# Altium PCB iMX6 Rex Development Baseboard V1I1_PCB.PcbDoc (part 5 of 6)
Units mm, origin at the board's own origin, x right, y up, seen from the top; angles counter-clockwise.
Board outline 135 x 110 mm, 6 copper layers (L1, L2, L3, L4 (PWR), L5, L6), stack 1.542 mm thick; 580 components, 458 nets, 2100 pads, 1201 vias.
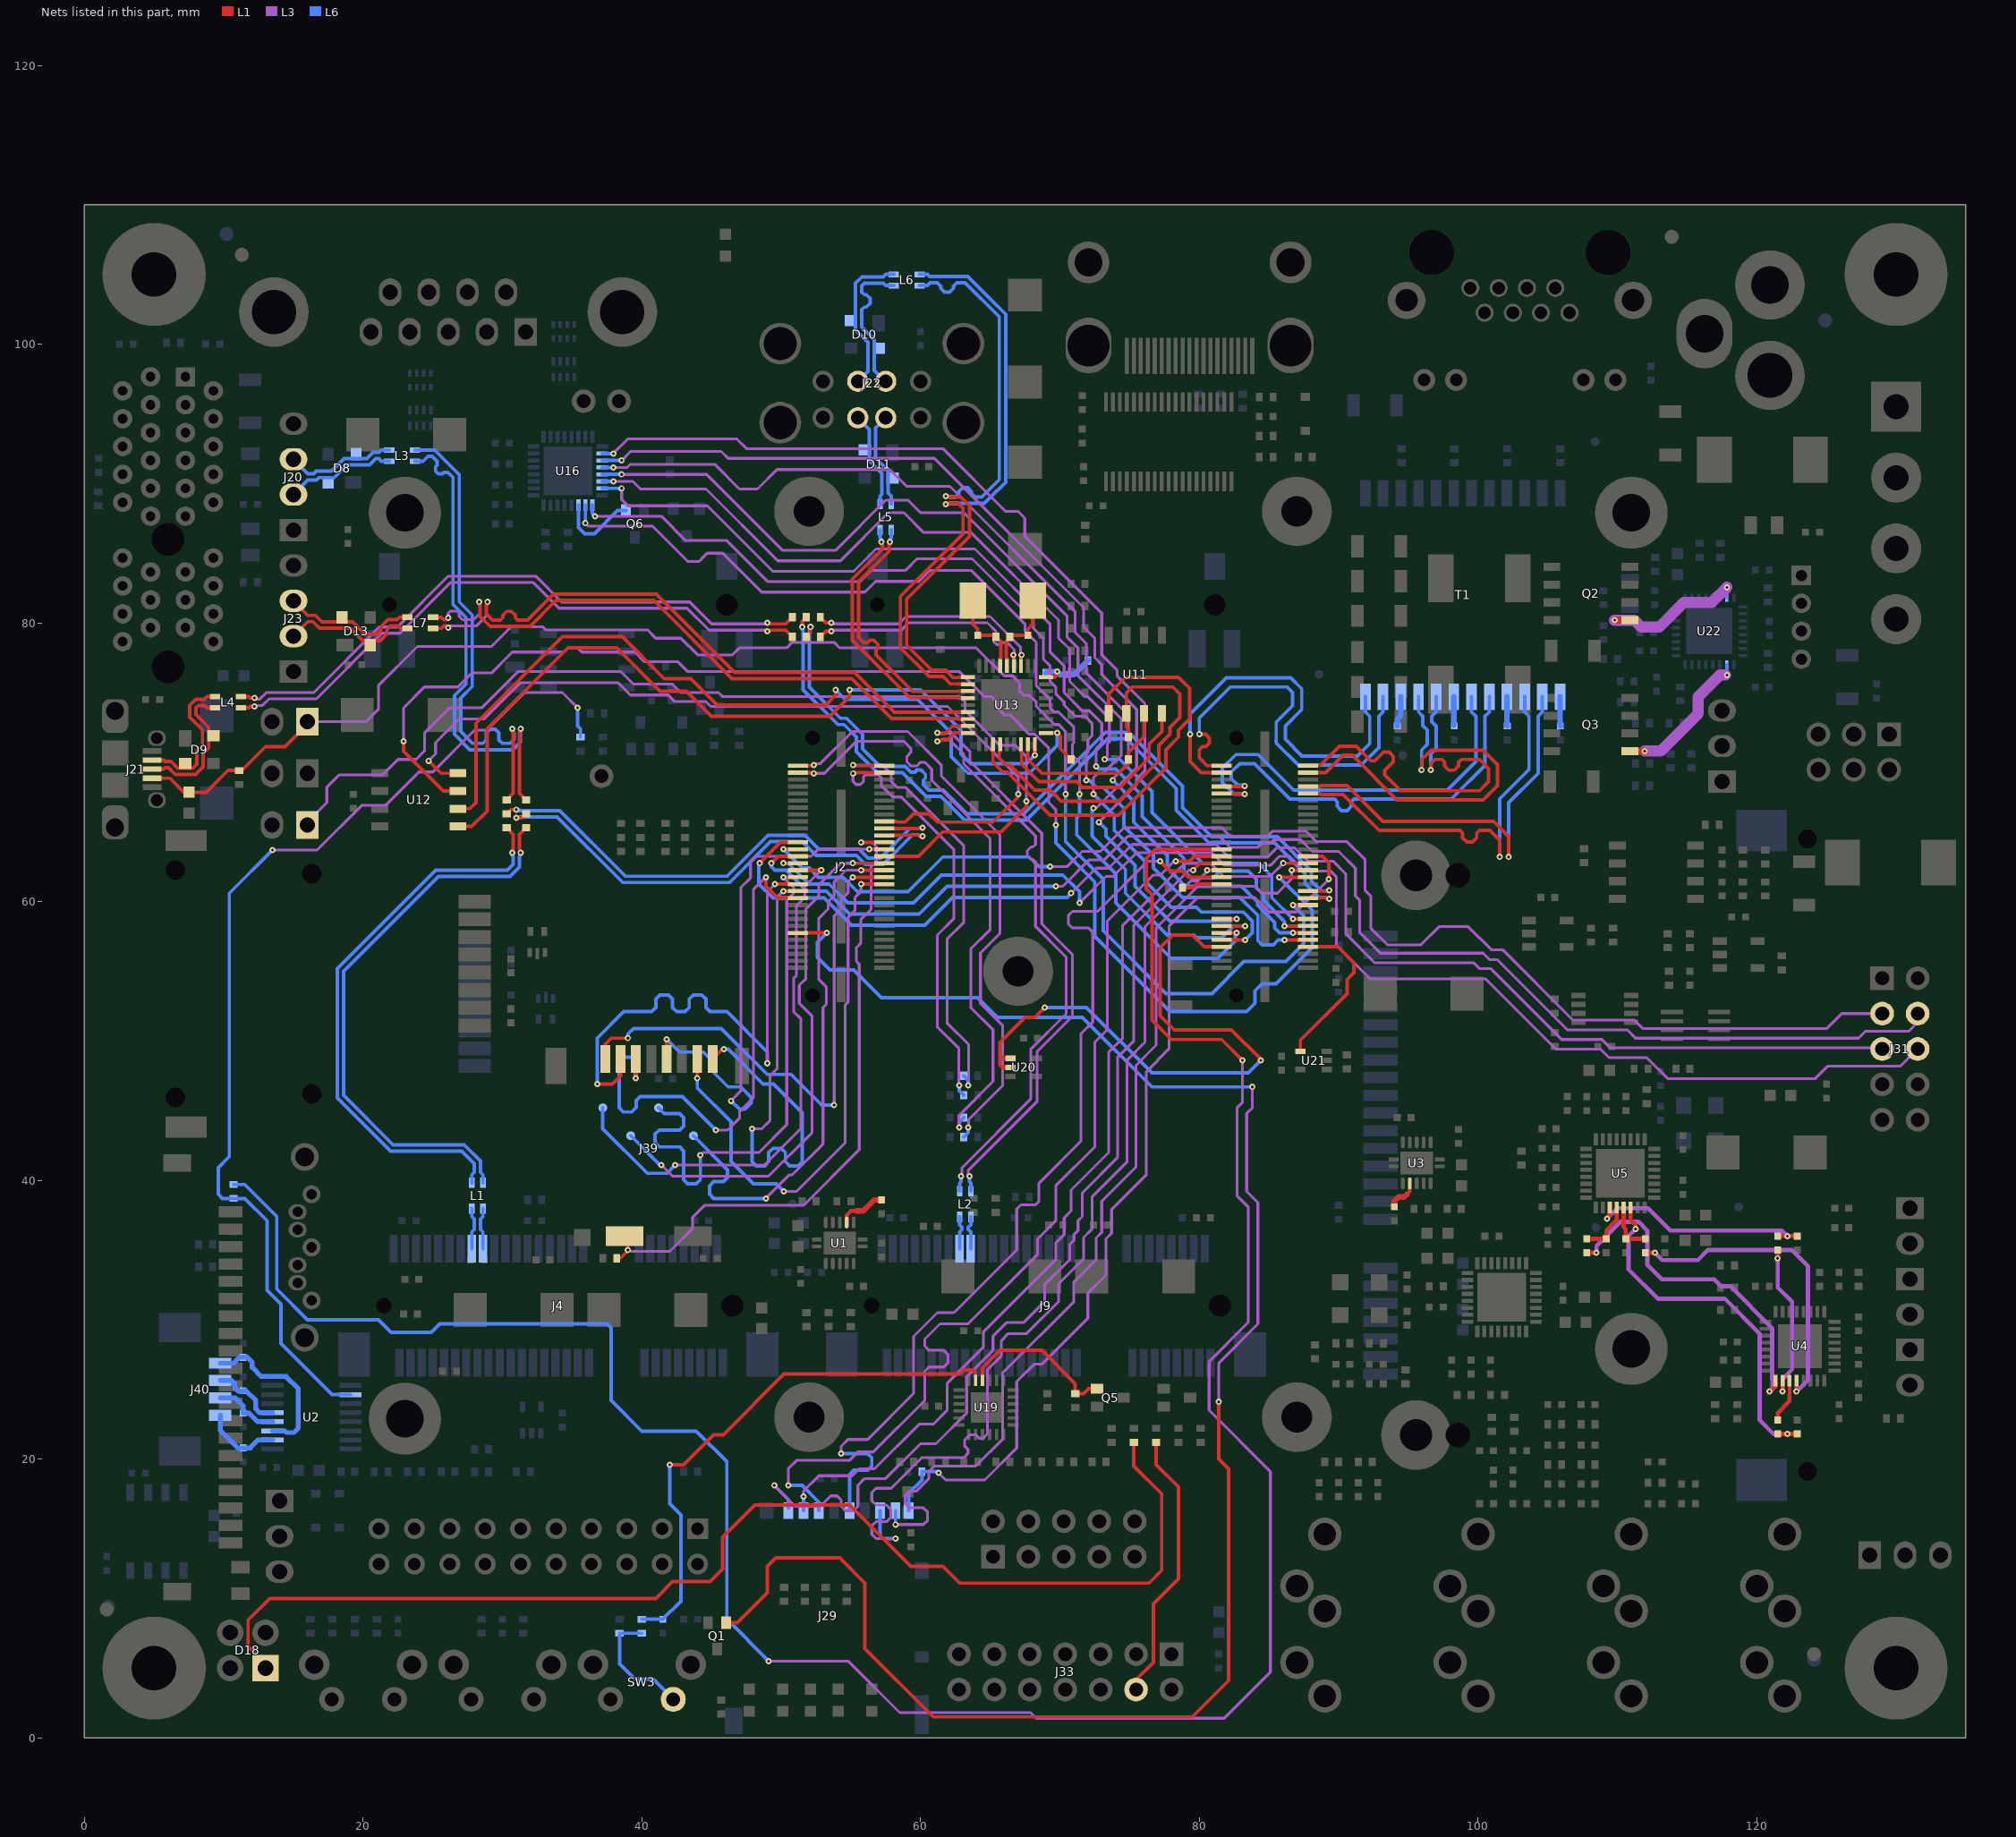
[diagram p9: the nets of this part, all layers, seen from the top]

## Via types
v1: diameter 0.45, hole 0.2, L1 to L6, tented both sides, 1092 vias
v2: diameter 1, hole 0.5, L1 to L6, tented both sides, 109 vias

## Nets (pads, with @x,y where several pads share a name; then routed paths per layer and width w, separated by ;. In a path a pad name is that pad's centre, name@x,y a point inside that pad or via, vN(x,y) a via of type N, cw(c..) or ccw(c..) an arc to the next point about the centre after c; other vN are vias at no path point) (continued)
SATA_RX_N: J2.58 R36.1 R37.1 | length 32.1
  L1 w0.25: v1(55.15,69.2) 55.2,69.25 J2.58@57.39,69.25
  L3 w0.2: v1(55.15,69.2) 55.15,68.625 55.375,68.4 55.678,68.4 55.9,68.622 55.9,68.95 56.05,69.1 56.95,69.1 57.2,68.85 57.2,68.31 58.01,67.5 58.61,67.5 62.4,63.71 62.4,58.8 61.2,57.6 61.2,51 62.75,49.45 62.75,46.825 v1(62.775,46.8)
  L6 w0.25: v1(62.775,46.8) 62.775,46.425 R36.1@63.1,46.1
SATA_RX_P: J2.60 R38.1 R39.1 | length 32.1
  L1 w0.25: v1(55.15,69.8) 55.2,69.75 J2.60@57.39,69.75
  L3 w0.2: v1(55.15,69.8) 57.24,69.8 57.9,69.14 57.9,68.6 58.3,68.2 58.9,68.2 63.1,64 63.1,58.51 61.9,57.31 61.9,51.29 63.45,49.74 63.45,46.825 v1(63.425,46.8)
  L6 w0.25: R38.1@63.1,47.5 63.425,47.175 v1(63.425,46.8)
SATA_TX_N: J2.57 R40.1 R41.1 | length 43.1
  L1 w0.25: J2.57@51.21,69.25 52.3,69.25 v1(52.35,69.2)
  L3 w0.2: v1(52.35,69.2) 53.1,69.2 55.403,71.503 58.797,71.503 59.3,71 59.3,70.7 59.025,70.425 59.025,70.025 59.325,69.725 59.725,69.725 60,70 60.3,70 60.8,69.5 60.8,68.7 65,64.5 65,58 63.6,56.6 63.6,52.4 65.2,50.8 65.2,47.1 62.75,44.65 62.75,43.825 v1(62.775,43.8)
  L6 w0.25: v1(62.775,43.8) 62.775,44.175 R40.1@63.1,44.5
SATA_TX_P: J2.59 R42.1 R43.1 | length 43.1
  L1 w0.25: J2.59@51.21,69.75 52.3,69.75 v1(52.35,69.8)
  L3 w0.2: v1(52.35,69.8) 52.45,69.9 52.81,69.9 55.113,72.203 59.087,72.203 61.5,69.79 61.5,68.99 65.7,64.79 65.7,57.71 64.3,56.31 64.3,52.69 65.9,51.09 65.9,46.81 63.45,44.36 63.45,43.825 v1(63.425,43.8)
  L6 w0.25: R42.1@63.1,43.1 63.425,43.425 v1(63.425,43.8)
SD2_ACT: J2.11 Q1.1 | length 131.3
  L1 w0.25: Q1.1@46.05,8.25 46.85,8.25 49,10.4 49,12.3 49.6,12.9 54.2,12.9 56,11.1 56,6.4 60.9,1.5 79.5,1.5 82.1,4.1 82.1,19.3 81.4,20 v1(81.4,24.1) ; J2.11@51.21,57.75 v1(53.27,57.75)
  L3 w0.2: v1(81.4,24.1) 81.4,26.9 84.2,29.7 84.2,38.4 83.4,39.2 83.4,44.8 83.8,45.2 v1(83.8,46.7)
  L6 w0.25: v1(53.27,57.75) 52.62,57.1 52.6,57.1 52.6,56 53.5,55.1 55.2,55.1 57.2,53.1 64.1,53.1 65.5,51.7 71.6,51.7 76.6,46.7 v1(83.8,46.7)
SD2_CD: J2.38 J39.9 R104.2 | length 47.3
  L1 w0.25: R104.2@38.2,34.4 38.458,34.4 38.94,34.882 v1@38.975,34.882 ; J39.9@38.775,36 38.975,35.8 39,35.775 v1(39,35) ; v1(55.73,64.25) J2.38@57.39,64.25
  L3 w0.2: v1@39.2,34.9 42,34.9 43.65,36.55 43.65,37.35 44.5,38.2 51.6,38.2 55.6,42.2 55.6,55.5 55.4,55.7 55.4,56.7 55.7,57 55.7,58.7 56.45,59.45 56.45,62.52 56.83,62.9 56.83,63.15 56.83,63.957 56.537,64.25 v1(55.73,64.25)
SD2_CLK: J2.36 J39.5 | length 39.6
  L1 w0.25: J39.5@41.775,48.7 v1(41.775,50.125) ; v1(56.33,63.75) J2.36@57.39,63.75
  L3 w0.2: v1(46.4,45.7) 47.1,46.4 47.1,61 47.8,61.7 47.8,62.807 48.243,63.25 52.15,63.25 52.65,63.75 v1(56.33,63.75)
  L6 w0.25: v1(41.775,50.125) 42.7,49.2 44.4,49.2 45.2,48.4 45.2,47.693 46.193,46.7 47.1,46.7 47.85,45.95 47.85,45.55 47.4,45.1 47,45.1 v1(46.4,45.7)
SD2_CMD: J2.21 J39.3 | length 39.6
  L1 w0.25: v1(39.575,47.325) J39.3@39.575,48.7 ; v1(48.9,61.75) 48.9,61.1 49.75,60.25 J2.21@51.21,60.25
  L3 w0.2: v1(45.3,43.6) 46.15,43.6 47,44.45 47,44.9 48,45.9 48,60.85 v1(48.9,61.75)
  L6 w0.25: v1(39.575,47.325) 39.575,48.525 39.275,48.825 38.675,48.825 38.375,48.525 38.375,45.2 38.675,44.9 39.275,44.9 39.6,45.225 39.6,45.725 39.875,46 42.9,46 v1(45.3,43.6)
SD2_DATA0: J2.26 J39.7 | length 39.6
  L1 w0.25: v1(43.975,47.325) J39.7@43.975,48.7 ; v1(55.73,61.25) J2.26@57.39,61.25
  L3 w0.2: v1(50.2,39.2) 51.1,39.2 54.6,42.7 54.6,52.6 54.8,52.8 54.8,58.87 55.3,59.37 55.3,60.3 55.73,60.73 v1(55.73,61.25)
  L6 w0.25: v1(43.975,47.325) 43.975,46.625 46.4,44.2 46.4,41.35 48,39.75 49.65,39.75 v1(50.2,39.2)
SD2_DATA1: J2.23 J39.8 | length 39.6
  L1 w0.25: J39.8@45.075,48.7 45.775,49.4 v1(45.9,49.4) ; v1(50.15,60.75) J2.23@51.21,60.75
  L3 w0.2: v1(47.9,43.7) 48.6,43.7 49.2,44.3 49.2,47.5 49.7,48 49.7,60.3 v1(50.15,60.75)
  L6 w0.25: v1(45.9,49.4) 46.2,49.4 48.7,46.9 49.45,46.9 51.5,44.85 51.5,41.334 51.2,41.034 50.6,41.034 50.3,41.334 50.3,41.984 50,42.284 49.4,42.284 49.1,41.984 49.1,41.334 48.8,41.034 48.2,41.034 47.9,41.334 v1(47.9,43.7)
SD2_DATA2: J2.28 J39.1 | length 39.6
  L1 w0.25: J39.1@37.375,48.7 37.375,49.775 37.8,50.2 v1(39,50.2) ; v1(55.13,61.75) J2.28@57.39,61.75
  L3 w0.2: v1(53.8,45.4) 53.8,58.97 54.3,59.47 54.3,60.131 54.8,60.631 54.8,61.42 v1(55.13,61.75)
  L6 w0.25: v1(39,50.2) 39,50.5 39.4,50.9 45.707,50.9 49.007,47.6 50.7,47.6 52.9,45.4 v1(53.8,45.4)
SD2_DATA3: J2.25 J39.2 | length 39.6
  L1 w0.25: v1(36.8,46.9) 37.9,46.9 38.475,47.475 J39.2@38.475,48.7 ; v1(49.55,61.25) J2.25@51.21,61.25
  L3 w0.2: v1(49,48.4) 49,60.7 v1(49.55,61.25)
  L6 w0.25: v1(36.8,46.9) 36.8,50.2 38.7,52.1 40.7,52.1 41,52.4 41,53 41.3,53.3 41.9,53.3 42.2,53 42.2,52.4 42.5,52.1 43.1,52.1 43.4,52.4 43.4,53 43.7,53.3 44.3,53.3 44.6,53 44.6,52.4 44.9,52.1 46.1,52.1 49,49.2 v1(49,48.4)
SD2_DATA4: J2.30 TP7.1 | length 39.6
  L1 w0.25: v1(55.73,62.25) J2.30@57.39,62.25
  L3 w0.2: v1(48.9,38.7) 50.6,40.4 50.8,40.4 53,42.6 53,52.4 53.25,52.65 53.25,53.85 52.7,54.4 52.7,58.8 53.37,59.47 53.37,60 53.8,60.43 53.8,61.4 54.65,62.25 v1(55.73,62.25)
  L6 w0.25: TP7.1@43.7,43.2 46.15,40.75 46.15,40.2 45.85,39.9 45.15,39.9 44.85,39.6 44.85,39 45.15,38.7 v1(48.9,38.7)
SD2_DATA5: J2.27 TP6.1 | length 39.6
  L1 w0.25: v1(50.15,61.75) J2.27@51.21,61.75
  L3 w0.2: v1(44.2,41.8) 44.4,42 48.4,42 50.4,44 50.4,60.1 50.9,60.6 50.9,61 v1(50.15,61.75)
  L6 w0.25: TP6.1@41.2,45.2 41.6,44.8 42.7,44.8 43,44.5 43,43.9 42.7,43.6 41.25,43.6 40.95,43.3 40.95,42.7 41.25,42.4 42.7,42.4 43,42.1 43,40.05 43.3,39.75 43.9,39.75 44.2,40.05 v1(44.2,41.8)
SD2_DATA6: J2.32 TP9.1 | length 39.6
  L1 w0.25: v1(55.13,62.75) J2.32@57.39,62.75
  L3 w0.2: v1(41.4,41.1) 42.2,40.3 49.1,40.3 52.2,43.4 52.2,51.8 51.3,52.7 51.3,54 51.77,54.47 51.77,59.47 52.7,60.4 52.7,61.2 54.25,62.75 v1(55.13,62.75)
  L6 w0.25: TP9.1@39.2,43.2 41.3,41.1 v1(41.4,41.1)
SD2_DATA7: J2.29 TP8.1 | length 39.6
  L1 w0.25: J2.29@51.21,62.25 v1(52.87,62.25)
  L3 w0.2: v1(42.4,41.1) 48.8,41.1 51.4,43.7 51.4,51.6 50.9,52.1 50.9,54.5 51.1,54.7 51.1,59.7 51.7,60.3 51.7,61.08 v1(52.87,62.25)
  L6 w0.25: TP8.1@37.2,45.2 37.2,43.7 40.4,40.5 41.8,40.5 v1(42.4,41.1)
SD2_WP: J2.34 JP3.1 | length 75.8
  L1 w0.25: J2.34@57.39,63.25 59.85,63.25 61.6,65 65.8,65 67.6,66.8 v1(67.6,67.2)
  L3 w0.2: JP3.1@16,65.5 16,65.7 17.4,67.1 17.4,68.2 18.3,69.1 21.399,69.1 22.499,70.2 23.8,70.2 24.4,70.8 24.4,72.1 26.2,73.9 28.5,73.9 31.1,76.5 38.5,76.5 39.4,75.6 42.2,75.6 42.8,75 45.5,75 45.8,74.7 62.8,74.7 63.2,74.3 63.2,73.693 65.693,71.2 66.8,71.2 67.6,70.4 v1(67.6,67.2)
SD3_CD: J1.34 J29.9 R106.2 | length 70.1
  L1 w0.25: J1.34@87.79,63.25 88.85,63.25 89.3,62.8 v1(89.3,61.6)
  L3 w0.2: v1(61.3,19) 61.8,18.5 64.6,18.5 66.9,20.8 66.9,25.557 68.143,26.8 68.707,26.8 72,30.093 72,31.9 73.3,33.2 73.3,35.8 73.704,36.204 73.704,37.904 76.2,40.4 76.2,47.8 77.825,49.425 77.825,58.232 79.893,60.3 83.95,60.3 85,59.25 86.937,59.25 v1@89.3,61.613
  L6 w0.25: J29.9@59.15,16.3 59.15,17.55 60.1,18.5 R106.2@60.1,19.1 61.2,19.1 v1(61.3,19)
SD3_CLK: J1.27 J29.5 | length 70.1
  L1 w0.25: v1(77.2,62.9) 77.9,62.2 78.8,62.2 79.25,61.75 J1.27@81.61,61.75
  L3 w0.2: v1(54.3,20.4) 54.3,20.9 54.8,21.4 56.2,21.4 59.5,24.7 59.5,28.8 61.2,30.5 62.4,30.5 66.9,35 66.9,37.94 67.2,38.24 68.24,38.24 68.5,38.5 68.5,39.8 71.5,42.8 71.5,50.5 72.36,51.36 72.36,57.8 72.06,58.1 70.9,58.1 70.6,58.4 70.6,59 70.9,59.3 72.7,59.3 76.3,62.9 v1(77.2,62.9)
  L6 w0.25: v1(54.3,20.4) 56.2,20.4 56.5,20.1 56.5,19.5 56.2,19.2 55.2,19.2 54.9,18.9 J29.5@54.9,16.3
SD3_CMD: J1.33 J29.3 | length 70.1
  L1 w0.25: v1(78.3,62.9) 79.3,62.9 79.65,63.25 J1.33@81.61,63.25
  L3 w0.2: v1(50.5,18.1) 50.5,19.3 51.1,19.9 54.9,19.9 55.5,20.5 56.6,20.5 60.3,24.2 60.3,26.3 60.6,26.6 61.66,26.6 61.96,26.9 61.96,27.5 61.66,27.8 60.6,27.8 60.3,28.1 60.3,28.607 61.393,29.7 63.4,29.7 68.4,34.7 68.4,35.8 69.7,37.1 69.7,39.6 72.5,42.4 72.5,49.9 73.4,50.8 73.4,58.607 76.693,61.9 77.2,61.9 78.2,62.9 v1(78.3,62.9)
  L6 w0.25: v1(50.5,18.1) 51.507,18.1 52.7,16.907 J29.3@52.7,16.3
SD3_DATA0: J1.29 J29.7 | length 70.1
  L1 w0.25: v1(80.55,62.25) J1.29@81.61,62.25
  L3 w0.2: v1(58.2,14.3) 56.8,14.3 56.5,14.6 56.5,15.2 56.8,15.5 57.55,15.5 57.85,15.8 57.85,16.4 57.55,16.7 56.8,16.7 56.5,17 56.5,17.6 56.8,17.9 57.893,17.9 60.093,20.1 63.1,20.1 63.4,20.4 63.4,20.7 63.15,20.95 63.15,21.35 63.55,21.75 63.95,21.75 64.2,21.5 64.5,21.5 64.8,21.8 64.8,26.4 65.8,27.4 65.8,28.507 66.293,29 67.607,29 69.9,31.293 69.9,32.569 71.7,34.369 71.7,35.9 72.3,36.5 72.3,38.8 74.8,41.3 74.8,48.6 76.1,49.9 76.1,58.2 79.4,61.5 79.9,61.5 80.55,62.15 v1(80.55,62.25)
  L6 w0.25: J29.7@57.1,16.3 57.1,15 57.1,14.5 57.3,14.3 v1(58.2,14.3)
SD3_DATA1: J1.30 J29.8 | length 70.1
  L1 w0.25: v1(86.62,62.25) J1.30@87.79,62.25
  L3 w0.2: v1(58.2,15.3) 60.2,15.3 60.5,15.6 60.5,16.2 60.2,16.5 59.2,16.5 58.9,16.8 58.9,17.4 59.2,17.7 59.7,17.7 60.6,18.6 60.6,19.1 61,19.5 63.966,19.5 65.9,21.434 65.9,26.2 71,31.3 71,32.7 72.6,34.3 72.6,35.862 73,36.262 73,38.5 75.45,40.95 75.45,48.25 76.9,49.7 76.9,58.1 79.9,61.1 83.975,61.1 84.475,60.6 85.6,60.6 86.62,61.62 v1(86.62,62.25)
  L6 w0.25: v1(58.2,15.3) J29.8@58.2,16.3
SD3_DATA2: J1.31 J29.1 | length 70.1
  L1 w0.25: v1(79.55,62.25) 80.05,62.75 J1.31@81.61,62.75
  L3 w0.2: v1(49.5,18.1) 51,16.6 52.8,16.6 53.56,17.36 54,17.36 54.3,17.06 54.3,16.6 54.6,16.3 55.2,16.3 55.5,16.6 55.5,18.107 55.993,18.6 57.5,18.6 60,21.1 61.1,21.1 63.3,23.3 63.3,25.9 65.2,27.8 65.2,28.807 66.2,29.807 67.407,29.807 68.9,31.3 68.9,32.507 70.7,34.307 70.7,35.393 71.007,35.7 71.007,36.1 71.3,36.393 71.3,37.1 71.6,37.4 71.6,39.1 74.15,41.65 74.15,48.85 75.3,50 75.3,58.3 79.25,62.25 v1(79.55,62.25)
  L6 w0.25: v1(49.5,18.1) 50.5,17.1 J29.1@50.5,16.5
SD3_DATA3: J1.32 J29.2 | length 70
  L1 w0.25: v1(86.03,62.75) J1.32@87.79,62.75
  L3 w0.2: v1(51.6,17.3) 51.6,17.7 52.7,18.8 55.1,18.8 55.6,19.3 56.693,19.3 59.893,22.5 60.907,22.5 61.9,23.493 61.9,25.407 64.5,28.007 64.5,29.1 69.7,34.3 69.7,35.5 70.3,36.1 70.3,37.3 70.8,37.8 70.8,39.3 73.5,42 73.5,49.2 74.5,50.2 74.5,58.293 78.957,62.75 80.8,62.75 81.75,61.8 85.073,61.8 86.023,62.75 v1(86.03,62.75)
  L6 w0.25: J29.2@51.6,16.3 v1(51.6,17.3)
SD3_WP: J1.25 R105.2 | length 2.9
  L1 w0.25: R105.2@78.8,61 79.55,61 79.8,61.25 J1.25@81.61,61.25
SPKR_C_LOUT+: C52.2 U4.3 | length 3.2
  L1 w0.25: 122.35,24.608 U4.3@122.35,25.625
  L1 w0.3: C52.2@121.5,22.8 121.5,23.3 122.35,24.15 122.35,24.608
SPKR_C_LOUT-: C47.2 U4.4 | length 22.8
  L1 w0.28: v1(122.85,24.85) U4.4@122.85,25.625
  L1 w0.3: C47.2@112,34.8 v1(112.7,34.8)
  L3 w0.3: v1(112.7,34.8) 113.225,34.275 115.775,34.275 116.5,35 122.5,35 123.675,33.825 123.675,25.675 v1(122.85,24.85)
SPKR_C_ROUT+: C56.2 U4.2 | length 11.6
  L1 w0.28: v1(121.85,24.85) U4.2@121.85,25.625
  L1 w0.3: v1(121.5,34.4) C56.2@121.5,35
  L3 w0.3: v1(121.5,34.4) 121.5,32.3 122.525,31.275 122.525,26.425 121.85,25.75 v1(121.85,24.85)
SPKR_C_ROUT-: C55.2 U4.1 | length 24.8
  L1 w0.28: v1(120.9,24.85) 121,24.85 121.35,25.2 U4.1@121.35,25.625
  L1 w0.3: C55.2@107.8,34.8 v1(108.5,34.8)
  L3 w0.28: v1(120.9,24.85) 121.1,25.05 121.1,25.7
  L3 w0.3: v1(108.5,34.8) 108.5,35.3 110.225,37.025 111.517,37.025 112.142,36.4 112.142,33.958 113.2,32.9 116.942,32.9 117.442,32.4 118.1,32.4 121.1,29.4 121.1,25.7
SPKR_LOUT+: C52.1 C210.1 U5.22 | length 26.1
  L1 w0.3: U5.22@110.95,38.05 110.95,37.15 111.3,36.8 v1(111.3,36.5) ; C52.1@121.5,21.8 v1(122.2,21.8) C210.1@122.9,21.8
  L3 w0.3: v1(111.3,36.5) 110.8,36 110.8,33.6 112.9,31.5 117.7,31.5 120.2,29 120.2,22.8 121.2,21.8 v1(122.2,21.8)
SPKR_LOUT-: C47.1 C209.2 U5.21 | length 3.7
  L1 w0.3: U5.21@110.45,38.05 110.45,36.65 110.6,36.5 C209.2@110.6,35.8 C47.1@112,35.8
SPKR_ROUT+: C56.1 C212.1 U5.19 | length 16.4
  L1 w0.3: v1(109.25,37.25) 109.45,37.45 U5.19@109.45,38.05 ; C56.1@121.5,36 v1(122.2,36) C212.1@122.9,36
  L3 w0.3: v1(109.25,37.25) 110,38 112.2,38 113.8,36.4 121.8,36.4 v1(122.2,36)
SPKR_ROUT-: C55.1 C211.2 U5.20 | length 4
  L1 w0.3: C55.1@107.8,35.8 C211.2@109.2,35.8 109.2,36.4 109.95,37.15 U5.20@109.95,38.05
SS_+1V5: C21.1 U1.7 | length 3.5
  L1 w0.28: U1.7@54.7,36.975 54.7,37.5 55,37.8 55.4,37.8
  L1 w0.4: 55.4,37.8 55.9,37.8 56.7,38.6 C21.1@57.2,38.6
SS_+1V8_AUDIO2: C36.1 U3.7 | length 2.2
  L1 w0.283: 95,39.1 95.1,39.2 U3.7@95.1,39.775
  L1 w0.4: C36.1@94,38.1 94,38.5 94.3,38.8 94.7,38.8 94.9,39
SYS_POKN: J1.8 U21.4 | length 11.7
  L1 w0.25: U21.4@87.25,49.25 87.25,50.05 90.6,53.4 90.6,54.4 91.1,54.9 91.1,55.6 89.95,56.75 89.1,56.75 J1.8@87.79,56.75
SYS_RSTN: J1.7 U20.1 U20.2 | length 43.9
  L1 w0.25: U20.2@66.45,48.1 65.9,48.1 65.7,48.3 65.7,49 ; U20.1@66.45,48.75 65.95,48.75 65.7,49 ; v1(68.9,52.4) 68.2,51.7 67.5,51.7 65.7,49.9 65.7,49 ; J1.7@81.61,56.75 80.35,56.75 79.5,57.6 78.1,57.6 77.2,56.7 77.2,51.8 78.2,50.8 82.3,50.8 v1@84.4,48.7
  L6 w0.25: v1(68.9,52.4) 71.9,52.4 76.6,47.7 83.5,47.7 v1(84.4,48.6)
TCT0: C118.2 T1.10 | length 2.2
  L6 w0.4: C118.2@94.2,72.6 94.2,73.073 94.455,73.328 T1.10@94.455,74.697
TCT1: C116.2 T1.4 | length 2.1
  L6 w0.4: T1.4@102.075,74.697 102.075,72.625 C116.2@102.1,72.6
TCT2: C117.2 T1.7 | length 2
  L6 w0.4: C117.2@98.265,72.665 T1.7@98.265,74.697
TCT3: C114.2 T1.1 | length 2.1
  L6 w0.4: T1.1@105.885,74.697 105.885,72.615 C114.2@105.9,72.6
TRD0_N: J1.57 T1.12 | length 29.9
  L1 w0.25: v1(79.35,72) 79.35,70.05 80.15,69.25 J1.57@81.61,69.25
  L6 w0.25: v1(79.35,72) 79.35,73.45 81.95,76.05 86.569,76.05 87.35,75.269 87.35,73.781 86.169,72.6 86.169,71.65 87.369,70.45 91.35,70.45 92.225,71.325 92.225,73.29 91.915,73.6 T1.12@91.915,74.697
TRD0_P: J1.59 T1.11 | length 29.9
  L1 w0.25: v1(80,72) 80.45,72 80.725,71.725 80.725,71.375 80.45,71.1 80.2,71.1 80,70.9 80,70.319 80.569,69.75 J1.59@81.61,69.75
  L6 w0.25: v1(80,72) 80,73.181 82.219,75.4 86.3,75.4 86.7,75 86.7,74.05 85.519,72.869 85.519,71.512 ; 85.5,71.531 85.519,71.512 ; T1.11@93.185,74.697 93.185,73.6 92.875,73.29 92.875,71.056 91.619,69.8 87.1,69.8 85.519,71.381 85.519,71.512
TRD1_N: J1.51 T1.6 | length 29.9
  L1 w0.25: J1.51@81.61,67.75 83.2,67.75 v1(83.25,67.7)
  L6 w0.25: v1(83.25,67.7) 82.5,67.7 81.65,68.55 81.65,69.569 82.631,70.55 84.223,70.55 86.773,68 97.8,68 99.845,70.045 99.845,73.29 99.535,73.6 T1.6@99.535,74.697
TRD1_P: J1.53 T1.5 | length 29.9
  L1 w0.25: J1.53@81.61,68.25 83.2,68.25 v1(83.25,68.3)
  L6 w0.25: v1(83.25,68.3) 83.2,68.35 82.769,68.35 82.3,68.819 82.3,69.3 82.9,69.9 83.954,69.9 86.504,67.35 89.7,67.35 89.9,67.15 89.9,66.825 90.2,66.525 90.6,66.525 90.9,66.825 90.9,67.15 91.1,67.35 98.069,67.35 100.495,69.776 100.495,73.29 100.805,73.6 T1.5@100.805,74.697
TRD2_N: J1.58 T1.9 | length 29.9
  L1 w0.25: J1.58@87.79,69.25 89.069,69.25 90.319,70.5 90.981,70.5 94.181,67.3 100.369,67.3 101.4,68.331 101.4,69.819 100.37,70.85 96.631,70.85 95.95,70.169 v1(95.95,69.45)
  L6 w0.25: T1.9@95.725,74.697 95.725,73.6 96.035,73.29 96.035,72.631 96.35,72.316 96.35,71.269 95.95,70.869 v1(95.95,69.45)
TRD2_P: J1.60 T1.8 | length 29.9
  L1 w0.25: J1.60@87.79,69.75 88.65,69.75 90.05,71.15 91.25,71.15 92.3,70.1 92.6,70.1 93.225,70.725 93.625,70.725 93.925,70.425 93.925,70.025 93.3,69.4 93.3,69.1 94.45,67.95 100.1,67.95 100.75,68.6 100.75,69.55 100.1,70.2 98.8,70.2 98.6,70 98.6,69.725 98.3,69.425 97.9,69.425 97.6,69.725 97.6,70 97.4,70.2 96.9,70.2 96.6,69.9 v1(96.6,69.45)
  L6 w0.25: v1(96.6,69.45) 96.6,70.6 97,71 97,72.585 96.685,72.9 96.685,73.29 96.995,73.6 T1.8@96.995,74.697
TRD3_N: J1.52 T1.3 | length 29.9
  L1 w0.25: J1.52@87.79,67.75 88.65,67.75 88.725,67.675 90.325,67.675 92.9,65.1 98.7,65.1 98.9,64.9 98.9,64.575 99.2,64.275 99.6,64.275 99.9,64.575 99.9,64.9 100.1,65.1 100.85,65.1 101.55,64.4 v1(101.55,63.2)
  L6 w0.25: v1(101.55,63.2) 101.55,67.369 103.655,69.474 103.655,73.29 103.345,73.6 T1.3@103.345,74.697
TRD3_P: J1.54 T1.2 | length 29.9
  L1 w0.25: J1.54@87.79,68.25 88.65,68.25 88.725,68.325 90.594,68.325 93.169,65.75 101.119,65.75 102.2,64.669 v1(102.2,63.2)
  L6 w0.25: v1(102.2,63.2) 102.2,67.1 104.305,69.205 104.305,73.29 104.615,73.6 T1.2@104.615,74.697
TS_X+: C153.1 J40.4 U2.3 | length 11.8
  L6 w0.35: J40.4@9.75,26.875 10.7,26.875 11.125,27.3 C153.1@11.4,27.3 11.7,27.3 12.049,26.951 12.049,26.574 12.697,25.925 14.475,25.925 15.35,25.05 15.35,22.222 15.028,21.9 14.5,21.9 14.375,22.025 U2.3@13.5,22.025
TS_X-: C155.1 J40.3 U2.5 | length 5.2
  L6 w0.35: J40.3@9.75,25.625 10.575,25.625 10.8,25.4 10.8,25.1 11.025,24.875 11.325,24.875 C155.1@11.35,24.85 ; C155.1@11.4,24.9 11.6,24.9 12.3,24.2 12.3,23.6 12.575,23.325 U2.5@13.5,23.325
TS_Y+: C152.1 J40.1 U2.2 | length 5.6
  L6 w0.35: J40.1@9.75,23.125 9.75,22.05 11,20.8 C152.1@11.4,20.8 11.9,20.8 12.475,21.375 U2.2@13.5,21.375
TS_Y-: C154.1 J40.2 U2.4 | length 4.7
  L6 w0.35: J40.2@9.75,24.375 10.825,24.375 11.4,23.8 C154.1@11.4,23.3 11.8,23.3 12.425,22.675 U2.4@13.5,22.675
TSC_INT: J1.35 R174.1 | length 177.4
  L1 w0.25: J1.35@81.61,63.75 76.85,63.75 76.2,63.1 76.2,60.9 76.6,60.5 76.6,51.5 78,50.1 81.6,50.1 v1(83.1,48.6)
  L3 w0.2: v1(49.1,5.5) 54.8,5.5 58.5,1.8 67.9,1.8 68.3,1.4 81.8,1.4 85.1,4.7 85.1,19.1 80.7,23.5 80.7,26.993 83.5,29.793 83.5,38.1 82.7,38.9 82.7,45.2 83.1,45.6 v1(83.1,48.6)
  L6 w0.25: R174.1@10.7,39.7 11.5,39.7 13.8,37.4 13.8,32.2 16,30 21.1,30 22,29.1 24.9,29.1 25.5,29.7 37.5,29.7 37.8,29.4 37.8,24.2 40,22 43.9,22 46.1,19.8 46.1,8.5 v1(49.1,5.5)
TSC_PENIRQ: R173.1 R174.2 U2.10 | length 75.6
  L3 w0.2: v1(13.5,63.7) 16.7,63.7 19.9,66.9 21.6,66.9 24,69.3 25,69.3 28,72.3 28.9,72.3 31.6,75 34.3,75 v1(35.4,73.9)
  L6 w0.25: v1(13.5,63.7) 10.4,60.6 10.4,41.7 9.6,40.9 9.6,39 9.9,38.7 R174.2@10.7,38.7 11.5,38.7 13.1,37.1 13.1,32.1 14.1,31.1 14.1,28.3 17.775,24.625 U2.10@19.1,24.625 ; v1(35.4,73.9) 35.4,72.6 35.6,72.4 R173.1@35.6,71.8
UART1_CTS: J1.11 U16.18 | length 73
  L1 w0.25: J1.11@81.61,57.75 v1(82.67,57.75)
  L3 w0.2: v1(35.95,87.15) 36.15,86.95 40.75,86.95 43.3,84.4 44.1,84.4 44.4,84.7 44.4,84.707 44.693,85 45.8,85 48.6,82.2 56,82.2 56.775,82.975 59.875,82.975 60.65,83.75 63.65,83.75 67.5,79.9 67.5,79.4 68.3,78.6 68.3,75.5 69.3,74.5 69.3,73.893 69.593,73.6 69.9,73.6 71,72.5 71,71.407 70.9,71.307 70.9,70.5 71.4,70 v1(71.4,67.7)
  L6 w0.25: v1(35.95,87.15) U16.18@35.95,88.45 ; v1@71.4,67.5 71.4,66.2 71.2,66 71.2,64.8 74,62 74,59.9 77.975,55.925 81.325,55.925 82.58,57.18 82.58,57.66 v1(82.67,57.75)
UART1_DCD: J1.16 U16.14 | length 72.6
  L1 w0.25: v1(86.73,58.75) J1.16@87.79,58.75
  L3 w0.2: v1(37.95,90.15) 39.35,90.15 39.9,89.6 44.6,89.6 49.75,84.45 54.243,84.45 57.693,87.9 58.8,87.9 60.2,86.5 63.6,86.5 69.9,80.2 69.9,78.907 70.7,78.107 70.7,75.804 71.804,74.7 72.007,74.7 73.546,73.161 73.546,71.454 73.4,71.307 73.4,70.4 v1(73.2,70.2)
  L6 w0.25: U16.14@37.15,90.15 v1(37.95,90.15) ; v1(73.2,70.2) 74.3,70.2 76.6,67.9 76.6,66.4 80.25,62.75 84.25,62.75 85.2,61.8 85.2,60.28 v1(86.73,58.75)
UART1_DSR: J1.9 U16.13 | length 75.9
  L1 w0.25: J1.9@81.61,57.25 v1(83.28,57.25)
  L3 w0.2: v1(38.55,90.65) 44.66,90.65 50.11,85.2 53.9,85.2 57.5,88.8 59.1,88.8 60,87.9 63.1,87.9 70.5,80.5 70.5,79 71.3,78.2 71.3,76.2 74.4,73.1 74.4,70.5 73.1,69.2 72.7,69.2 72.4,68.9 v1(72.4,67.7)
  L6 w0.25: U16.13@37.15,90.65 v1(38.55,90.65) ; v1(72.4,67.7) 73.9,66.2 73.9,65.1 76.1,62.9 76.1,61.493 77.996,59.596 79.289,59.596 79.293,59.6 79.793,59.6 80.143,59.25 83.15,59.25 83.8,58.6 83.8,57.77 v1(83.28,57.25)
UART1_DTR: J1.15 U16.10 | length 75
  L1 w0.25: J1.15@81.61,58.75 v1(82.67,58.75)
  L3 w0.2: v1(37.95,92.15) 39,93.2 46.807,93.2 47.507,92.5 61.6,92.5 66.1,88 67,88 67,87.996 67.475,87.521 67.475,86.225 73,80.7 73,77.707 74.1,76.607 74.1,76.2 76.1,74.2 76.1,69.4 75.5,68.8 75.5,68.4 v1(72.8,65.7)
  L6 w0.25: U16.10@37.15,92.15 v1(37.95,92.15) ; v1(72.8,65.7) 73.3,65.2 73.3,64.7 75.4,62.6 75.4,61.1 77.9,58.6 82.241,58.6 82.391,58.75 v1(82.67,58.75)
UART1_RI: J1.10 U16.17 | length 73.9
  L1 w0.25: v1(86.12,57.25) J1.10@87.79,57.25
  L3 w0.2: v1(36.65,87.65) 41.4,87.65 43.15,85.9 46.1,85.9 49.05,82.95 55.65,82.95 56.45,83.75 58.9,83.75 59.75,84.6 63.7,84.6 68.1,80.2 68.1,79.593 68.8,78.893 68.8,77.4 69.3,76.9 69.3,75.8 69.7,75.4 69.7,74.907 70.3,74.307 70.3,74.1 71.1,73.3 71.807,73.3 72.3,72.807 72.3,71.893 72,71.593 72,70.7 71.9,70.6 v1(71.9,68.7)
  L6 w0.25: U16.17@36.45,88.45 36.45,87.85 v1(36.65,87.65) ; v1(71.9,68.7) 72.107,68.7 72.607,68.2 73.1,68.2 74.6,66.7 74.6,65.4 76.7,63.3 76.7,62.4 78.8,60.3 82.9,60.3 84.2,59 84.2,57.193 84.493,56.9 85.3,56.9 85.65,57.25 v1(86.12,57.25)
UART1_RTS: J1.13 U16.11 | length 76
  L1 w0.25: J1.13@81.61,58.25 v1(83.28,58.25)
  L3 w0.2: v1@38.45,91.65 v1@38.5,91.7 ; v1(38.55,91.65) 39.2,92.3 45.7,92.3 46.2,91.8 61,91.8 71.7,81.1 71.7,79.693 72.5,78.893 72.5,77.5 73,77 73,76.707 73,76.293 75.5,73.793 75.5,69.6 72.6,66.7 v1(72.4,66.7)
  L6 w0.25: U16.11@37.15,91.65 v1(38.55,91.65) ; v1(72.4,66.7) 72.3,66.6 72.3,64.7 74.7,62.3 74.7,60.6 77.7,57.6 79.593,57.6 79.793,57.4 81.613,57.4 82.456,58.244 ; 82.456,58.25 v1(83.28,58.25)
UART1_RXD: J1.14 U16.15 | length 72.7
  L1 w0.25: v1(86.12,58.25) J1.14@87.79,58.25
  L3 w0.2: v1(38.55,89.65) 38.55,88.85 39,88.4 44.7,88.4 49.4,83.7 55.2,83.7 56.8,85.3 63.9,85.3 69.3,79.9 69.3,77.9 70.3,76.9 70.3,76.293 70.3,74.993 71.593,73.7 72.1,73.7 73,72.8 73,71.393 72.6,70.993 v1(72.6,69.7)
  L6 w0.25: U16.15@37.15,89.65 v1(38.55,89.65) ; v1(72.6,69.7) 72.8,69.5 74,69.5 75.9,67.6 75.9,66.1 78.9,63.1 78.9,62.193 79.393,61.7 81,61.7 81.5,62.2 83.5,62.2 84.1,61.6 84.1,60.993 84.493,60.6 84.5,60.6 84.6,60.5 84.6,60.093 86.12,58.573 v1(86.12,58.25)
UART1_TXD: J1.12 U16.12 | length 74
  L1 w0.25: v1(86.73,57.75) J1.12@87.79,57.75
  L3 w0.2: v1(37.95,91.15) 38.95,91.15 39.175,91.375 45.225,91.375 47,89.6 48.3,89.6 49.7,91 57.8,91 59,89.8 62.1,89.8 71.1,80.8 71.1,79.3 71.9,78.5 71.9,76.393 74.9,73.393 74.9,69.9 73.8,68.8 v1(73.8,68.7)
  L6 w0.25: U16.12@37.15,91.15 v1(37.95,91.15) ; v1(73.8,68.7) 75.3,67.2 75.3,65.7 77.7,63.3 77.7,62.4 79,61.1 83.027,61.1 84.17,59.957 84.17,59.737 85.4,58.507 85.4,58.1 85.75,57.75 v1(86.73,57.75)
UART2_CTS: J2.31 J31.6 | length 98.3
  L1 w0.25: v1(50.15,62.75) J2.31@51.21,62.75
  L3 w0.2: v1(71.4,59.9) 73.3,61.8 73.8,61.8 75.5,63.5 80.899,63.5 81.799,62.6 85.1,62.6 85.75,63.25 86.5,63.25 87.55,62.2 89.407,62.2 89.83,61.777 89.83,56.87 92.252,54.448 100.552,54.448 105.6,49.4 108.807,49.4 109.407,48.8 112.1,48.8 113.6,47.3 124.2,47.3 125.1,48.2 130.32,48.2 J31.6@131.54,49.42
  L6 w0.25: v1(50.15,62.75) 50.497,62.75 51.997,61.25 53.45,61.25 53.45,61.243 54.793,59.9 59.5,59.9 61.5,61.9 70.207,61.9 71.4,60.707 v1(71.4,59.9)
UART2_RTS: J2.33 J31.4 | length 98.4
  L1 w0.25: v1(49.3,62.75) 49.8,63.25 J2.33@51.21,63.25
  L3 w0.2: v1(69.7,61.1) 70.2,61.1 72.1,63 73.2,63 74.9,64.7 81.4,64.7 82.2,63.9 84.2,63.9 84.2,63.907 84.493,64.2 85.1,64.2 85.35,64.45 87.25,64.45 88.1,63.6 90,63.6 91.2,62.4 91.2,60.407 91.5,60.107 91.5,57.8 93,56.3 100.366,56.3 100.838,55.827 101.373,55.827 106.4,50.8 110.7,50.8 111.3,50.2 127.3,50.2 127.8,50.7 130.9,50.7 131.54,51.34 J31.4@131.54,51.96
  L6 w0.25: v1(49.3,62.75) 49.3,62.5 49.55,62.25 50.357,62.25 51.857,60.75 53.25,60.75 54.9,59.1 59.9,59.1 61.9,61.1 v1(69.7,61.1)
UART2_RXD: J2.35 J31.3 | length 94.1
  L1 w0.25: v1(50.15,63.75) J2.35@51.21,63.75
  L3 w0.2: v1(69.3,62.5) 70.5,62.5 71.6,63.6 72.9,63.6 74.6,65.3 81.6,65.3 82.2,64.7 84.907,64.7 85.257,65.05 87.65,65.05 88.4,64.3 90.6,64.3 91.9,63 91.9,60.8 92.3,60.4 92.3,58.1 93.5,56.9 95.9,56.9 97.2,58.2 99.3,58.2 100.954,56.546 101.754,56.546 106.8,51.5 111.2,51.5 111.8,50.9 125.03,50.9 126.09,51.96 J31.3@129,51.96
  L6 w0.25: v1(50.15,63.75) 51.5,62.4 52.013,62.4 52.663,61.75 54.423,61.75 55.473,60.7 59.1,60.7 61.6,63.2 67.8,63.2 68.5,62.5 v1(69.3,62.5)
UART2_TXD: J2.37 J31.5 | length 98.3
  L1 w0.25: v1(48.45,62.75) 48.45,62.757 49.943,64.25 J2.37@51.21,64.25
  L3 w0.2: v1(70.8,60.6) 72.6,62.4 73.5,62.4 75.2,64.1 81.2,64.1 82.1,63.2 84.907,63.2 85.557,63.85 86.85,63.85 87.8,62.9 89.6,62.9 90.5,62 90.5,57.7 92.6,55.6 99.7,55.6 100.1,55.2 100.9,55.2 106,50.1 108.9,50.1 109.5,49.5 128.92,49.5 J31.5@129,49.42
  L6 w0.25: v1(48.45,62.75) 48.4,62.7 48.4,61.25 49.4,60.25 53.077,60.25 55.027,58.3 60.3,58.3 62.3,60.3 70.5,60.3 v1(70.8,60.6)
UART_WAKE: Q6.1 U16.19 | length 5.9
  L6 w0.25: U16.19@35.45,88.45 35.45,86.85 35.9,86.4 36.6,86.4 38.25,88.05 Q6.1@38.85,88.05
UGATE1_5V: Q2.1 U22.15 | length 11.3
  L1 w0.5: v1(109.8,80.195) Q2.1@110.9,80.195
  L3 w0.8: v1(109.8,80.195) 111.205,80.195 111.7,79.7 113,79.7 114.775,81.475 116.775,81.475 v1(117.85,82.55)
  L6 w0.23: U22.15@117.85,81.8 v1(117.85,82.55)
UGATE2_3V3: Q3.1 U22.26 | length 10.6
  L1 w0.5: Q3.1@110.9,70.795 v1@111.965,70.795
  L3 w0.8: v1(111.965,70.8) 113.1,70.8 115.8,73.5 115.8,74.7 117.35,76.25 v1@117.75,76.25
  L6 w0.23: v1(117.85,76.25) U22.26@117.85,77
USB0_ID: D19.1 J1.20 J21.4 JP1.1 R74.1 | length 113.6
  L1 w0.25: J21.4@4.875,68.85 6.15,68.85 7.15,67.85 D19.1@7.5,67.85 8.75,67.85 10.3,69.4 R74.1@11.1,69.4 11.3,69.4 13,71.1 14.4,71.1 16,72.7 JP1.1@16,72.9 ; v1(86.73,59.75) J1.20@87.79,59.75
  L3 w0.2: JP1.1@16,72.9 20.2,72.9 21.1,73.8 21.1,75.5 23.9,78.3 29.2,78.3 30.605,79.705 32.9,79.705 33.105,79.5 40.4,79.5 41,78.9 42.8,78.9 44,77.7 46.5,77.7 47,78.2 50.393,78.2 50.793,78.6 53.8,78.6 54.2,78.2 63.993,78.2 65.993,76.2 66.6,76.2 67.1,75.7 67.1,75.107 67.407,74.8 67.8,74.8 68.304,74.296 68.304,74.004 69.607,72.7 69.907,72.7 70.4,72.207 v1(70.4,67.7)
  L6 w0.25: v1(70.4,67.7) 70.4,64.3 73.1,61.6 73.1,57.9 77.6,53.4 80.9,53.4 83.2,55.7 86.2,55.7 87.5,57 87.5,58.98 v1(86.73,59.75)
USB0_N: J1.22 R62.1 R63.1 | length 57.7
  L1 w0.25: v1(51.5,79.7) 51.5,80.1 R62.1@51.8,80.4 ; J1.22@87.79,60.25 88.675,60.25 88.7,60.275 89.077,60.275 89.152,60.2 v1(89.33,60.2)
  L6 w0.25: v1(51.5,79.7) 51.5,79.522 51.575,79.447 51.575,75.189 54.064,72.7 54.507,72.7 55.4,71.807 55.4,70.764 56.914,69.25 58.7,69.25 60.4,67.55 61.45,67.55 63.15,65.85 67.594,65.85 73.444,71.7 74.764,71.7 78.35,68.114 78.35,66.55 80.7,64.2 85.4,64.2 87.6,62 87.6,61.289 88.614,60.275 89.077,60.275 89.152,60.2 v1(89.33,60.2)
USB0_P: J1.24 R65.1 R67.1 | length 57.7
  L1 w0.25: R65.1@51.8,79 52.1,79.3 v1(52.1,79.7) ; J1.24@87.79,60.75 88.675,60.75 88.7,60.725 89.077,60.725 89.152,60.8 v1(89.33,60.8)
  L6 w0.25: v1(52.1,79.7) 52.1,79.522 52.025,79.447 52.025,75.375 54.25,73.15 54.694,73.15 55.85,71.994 55.85,70.95 57.1,69.7 58.886,69.7 59.3,69.286 59.586,69.286 59.736,69.436 60.05,69.436 60.35,69.136 60.35,68.85 60.2,68.7 60.2,68.386 60.586,68 61.636,68 63.336,66.3 67.407,66.3 73.257,72.15 74.95,72.15 78.8,68.3 78.8,66.736 80.886,64.65 85.586,64.65 88.05,62.186 88.05,61.475 88.8,60.725 89.077,60.725 89.152,60.8 v1(89.33,60.8)
USB1_CON_N: D8.2 J20.2 L3.3 | length 8
  L6 w0.25: J20.2@15,89.2 16.045,90.245 16.645,90.245 16.825,90.425 17.5,90.425 17.925,90.425 18.825,91.325 20.461,91.325 20.911,91.775 21.125,91.775 21.3,91.6 L3.3@21.875,91.6
USB1_CON_P: D8.4 J20.3 L3.4 | length 8
  L6 w0.25: J20.3@15,91.74 16.045,90.695 16.459,90.695 16.639,90.875 17.739,90.875 18.639,91.775 19.5,91.775 20.275,91.775 20.725,92.225 21.125,92.225 21.3,92.4 L3.4@21.875,92.4
USB1_L_N: L3.2 R64.2 | length 35
  L1 w0.25: v1(31.3,72.4) 31.3,72.222 31.225,72.147 31.225,67.775 R64.2@31.7,67.3
  L6 w0.25: L3.2@23.725,91.6 24.3,91.6 24.65,91.95 24.95,91.95 25.3,91.6 25.3,91.3 25.2,91.2 25.2,90.9 25.4,90.7 25.7,90.7 25.8,90.8 26.1,90.8 26.45,90.45 26.45,81.314 27.382,80.382 27.382,75.618 26.55,74.786 26.55,72.014 27.664,70.9 30.736,70.9 31.3,71.464 v1(31.3,72.4)
USB1_L_P: L3.1 R68.2 | length 35
  L1 w0.25: R68.2@30.3,67.3 30.775,67.775 30.775,72.147 30.7,72.222 v1(30.7,72.4)
  L6 w0.25: L3.1@23.725,92.4 25.136,92.4 26.9,90.636 26.9,81.5 27.832,80.568 27.832,75.432 27,74.6 27,72.2 27.85,71.35 28.6,71.35 28.85,71.6 28.85,72.1 29.125,72.375 29.475,72.375 29.75,72.1 29.75,71.6 30,71.35 30.55,71.35 30.85,71.65 30.85,72.072 30.7,72.222 v1(30.7,72.4)
USB1_N: J2.40 R64.1 R66.1 | length 37.5
  L1 w0.25: v1(31,66) 31.4,66 R64.1@31.7,66.3 ; J2.40@57.39,64.75 58.275,64.75 58.3,64.775 59.877,64.775 59.952,64.7 v1(60.13,64.7)
  L6 w0.25: v1(31,66) 31.178,66 31.253,66.075 33.925,66.075 38.632,61.368 46.305,61.368 49.236,64.3 51.5,64.3 52.5,63.3 55.4,63.3 56.032,62.668 57.305,62.668 59.411,64.775 59.877,64.775 59.952,64.7 v1(60.13,64.7)
USB1_P: J2.42 R68.1 R69.1 | length 37.5
  L1 w0.25: R68.1@30.3,66.3 30.6,66.6 v1(31,66.6) ; J2.42@57.39,65.25 58.275,65.25 58.3,65.225 59.877,65.225 59.952,65.3 v1(60.13,65.3)
  L6 w0.25: v1(31,66.6) 31.178,66.6 31.253,66.525 34.111,66.525 38.818,61.818 46.118,61.818 49.05,64.75 51.686,64.75 52.686,63.75 55.586,63.75 56.218,63.118 57.118,63.118 59.225,65.225 59.877,65.225 59.952,65.3 v1(60.13,65.3)
USB1_PWR_EN: J2.44 U12.4 | length 62.7
  L1 w0.25: v1(24.7,70.1) 25.6,69.2 26.795,69.2 U12.4@26.8,69.205 ; J2.44@57.39,65.75 58.273,65.75 58.323,65.7 58.9,65.7 59.5,66.3 60.6,66.3 61.2,65.7 65.2,65.7 67,67.5 v1(67,67.7)
  L3 w0.2: v1(24.7,70.1) 25.2,70.6 25.2,71.4 26.9,73.1 28.7,73.1 31.3,75.7 38.3,75.7 39.183,74.817 41.883,74.817 42.35,74.35 44.6,74.35 44.95,74 61.943,74 67,68.943 v1(67,67.7)
USB_MPCIE1_CON_N: J4.36 L1.1 | length 3
  L6 w0.25: J4.36@28.6,35.1 28.6,36.3 28.425,36.475 28.425,37.225 28.6,37.4 L1.1@28.6,37.975
USB_MPCIE1_CON_P: J4.38 L1.2 | length 3
  L6 w0.25: J4.38@27.8,35.1 27.8,36.3 27.975,36.475 27.975,37.225 27.8,37.4 L1.2@27.8,37.975
USB_MPCIE1_N: L1.4 R66.2 | length 41.1
  L1 w0.25: v1(31.3,63.5) 31.3,63.678 31.225,63.753 31.225,64.825 R66.2@31.7,65.3
  L6 w0.25: L1.4@28.6,39.825 28.6,40.4 28.425,40.575 28.425,41.375 27.25,42.55 22.15,42.55 18.6,46.1 18.6,55 25.4,61.8 30.536,61.8 31.225,62.489 31.225,63.247 31.3,63.322 v1(31.3,63.5)
USB_MPCIE1_P: L1.3 R69.2 | length 41.1
  L1 w0.25: R69.2@30.3,65.3 30.775,64.825 30.775,63.753 30.7,63.678 v1(30.7,63.5)
  L6 w0.25: L1.3@27.8,39.825 27.8,40.4 27.975,40.575 27.975,41.189 27.064,42.1 21.964,42.1 18.15,45.914 18.15,55.186 25.214,62.25 30.35,62.25 30.775,62.675 30.775,63.247 30.7,63.322 v1(30.7,63.5)
USB_MPCIE2_CON_N: J9.36 L2.1 | length 2.4
  L6 w0.25: J9.36@63.6,35.1 63.6,36.3 63.425,36.475 63.425,36.625 63.6,36.8 L2.1@63.6,37.375
USB_MPCIE2_CON_P: J9.38 L2.2 | length 2.4
  L6 w0.25: J9.38@62.8,35.1 62.8,36.3 62.975,36.475 62.975,36.625 62.8,36.8 L2.2@62.8,37.375
USB_MPCIE2_N: L2.4 U13.8 | length 43.1
  L1 w0.25: v1(61.2,72.1) 61.378,72.1 61.453,72.025 61.725,72.025 62.275,72.575 62.675,72.575 62.7,72.6 U13.8@63.4,72.6
  L3 w0.2: v1(61.2,72.1) 61.207,72.093 62.207,72.093 63.55,70.75 63.55,70.05 68.7,64.9 68.7,58.4 70.9,56.2 70.9,51.764 68.35,49.214 68.35,45.642 63.425,40.717 63.425,40.375 v1(63.5,40.3)
  L6 w0.25: v1(63.5,40.3) 63.5,39.9 63.6,39.8 L2.4@63.6,39.225
USB_MPCIE2_P: L2.3 U13.9 | length 43.1
  L1 w0.25: v1(61.2,71.5) 61.378,71.5 61.453,71.575 61.911,71.575 62.461,72.125 62.675,72.125 62.7,72.1 U13.9@63.4,72.1
  L3 w0.2: v1(61.2,71.5) 61.413,71.5 61.557,71.643 62.02,71.643 63.1,70.564 63.1,69.864 68.25,64.714 68.25,64.1 68.075,63.925 67.925,63.925 67.65,63.65 67.65,63.3 67.925,63.025 68.075,63.025 68.25,62.85 68.25,58.214 70.45,56.014 70.45,51.95 67.9,49.4 67.9,45.828 62.975,40.903 62.975,40.811 62.975,40.375 v1(62.9,40.3)
  L6 w0.25: L2.3@62.8,39.225 62.8,39.8 62.9,39.9 v1(62.9,40.3)
USB_OC: J1.28 U12.3 | length 102.7
  L1 w0.25: v1(22.9,71.5) 22.9,70.8 25.765,67.935 U12.3@26.8,67.935 ; v1(85.73,61.75) J1.28@87.79,61.75
  L3 w0.2: v1(22.9,71.5) 22.9,73.9 24.4,75.4 26.8,75.4 27.8,76.4 29.2,76.4 30.7,77.9 34.4,77.9 34.7,78.2 35.4,78.2 35.7,77.9 39.5,77.9 40.2,77.2 42.6,77.2 43.3,76.5 62.793,76.5 64.593,74.7 65.1,74.7 65.5,74.3 65.5,73.9 66,73.4 66.407,73.4 67.807,72 68.2,72 69.2,71 69.2,67.1 69.7,66.6 v1(69.7,65.5)
  L6 w0.25: v1(69.7,65.5) 69.7,64.2 72.5,61.4 72.5,57.5 77.9,52.1 83.4,52.1 84,52.7 84,53.6 84.5,54.1 85.5,54.1 88.1,56.7 88.1,59.38 v1(85.73,61.75)
USB_OTG_CON_N: D9.2 J21.2 L4.3 | length 10.4
  L1 w0.25: J21.2@4.875,70.15 5.7,70.15 5.8,70.05 6.225,70.05 6.7,69.575 7.8,69.575 8.075,69.85 8.075,70.811 8.475,71.211 8.475,72.325 7.568,73.232 7.568,74.08 8.014,74.525 8.625,74.525 8.8,74.7 L4.3@9.375,74.7
USB_OTG_CON_P: D9.4 J21.3 L4.4 | length 10.4
  L1 w0.25: J21.3@4.875,69.5 5.7,69.5 5.8,69.6 6.039,69.6 6.514,69.125 7.986,69.125 8.525,69.664 8.525,70.625 8.925,71.025 8.925,72.511 8.018,73.418 8.018,73.893 8.2,74.075 8.625,74.075 8.8,73.9 L4.4@9.375,73.9
USB_OTG_N: L4.2 R62.2 | length 45
  L1 w0.25: L4.2@11.225,74.7 11.8,74.7 11.9,74.6 v1(12.2,74.6) ; v1(49,80) 49.178,80 49.253,79.925 50.325,79.925 R62.2@50.8,80.4
  L3 w0.2: v1(12.2,74.6) 12.275,74.525 12.589,74.525 13.064,75 16.464,75 21.164,79.7 22.464,79.7 26.114,83.35 32.386,83.35 34.236,81.5 43.436,81.5 45.011,79.925 48.925,79.925 v1(49,80)
USB_OTG_P: L4.1 R65.2 | length 45
  L1 w0.25: L4.1@11.225,73.9 11.8,73.9 11.9,74 v1(12.2,74) ; v1(49,79.4) 49.178,79.4 49.253,79.475 50.325,79.475 R65.2@50.8,79
  L3 w0.2: v1(12.2,74) 12.275,74.075 12.775,74.075 13.25,74.55 16.65,74.55 21.35,79.25 22.65,79.25 26.3,82.9 32.2,82.9 34.05,81.05 43.25,81.05 44.825,79.475 48.925,79.475 v1(49,79.4)
USB_UP_N: R63.2 U13.30 | length 17.1
  L1 w0.25: R63.2@52.8,80.4 53.2,80 v1(53.6,80) ; U13.30@67.2,76.9 67.2,77.65 v1(67.25,77.7)
  L3 w0.2: v1(53.6,80) 53.675,79.925 58.425,79.925 58.95,80.45 64.986,80.45 67.175,78.261 67.175,77.775 v1(67.25,77.7)
USB_UP_P: R67.2 U13.31 | length 17.1
  L1 w0.25: R67.2@52.8,79 53.2,79.4 v1(53.6,79.4) ; v1(66.65,77.7) 66.7,77.65 U13.31@66.7,76.9
  L3 w0.2: v1(53.6,79.4) 53.675,79.475 58.611,79.475 59.136,80 64.8,80 65.4,79.4 65.4,79.1 65.25,78.95 65.25,78.65 65.45,78.45 65.75,78.45 65.9,78.6 66.2,78.6 66.725,78.075 66.725,77.775 v1(66.65,77.7)
USB_XTALIN: C99.2 R23.2 U13.33 Y2.2 | length 6.3
  L1 w0.25: Y2.2@63.75,81.6 63.75,79.9 64.1,79.55 C99.2@64.1,79.1 65.3,79.1 R23.2@65.4,79 65.75,78.65 65.75,77.5 65.7,77.45 U13.33@65.7,76.9 ; C99.2@64.05,79.05 C99.2@64.1,79
USB_XTALOUT: C100.2 R23.1 U13.32 Y2.1 | length 6.2
  L1 w0.25: U13.32@66.2,76.9 66.2,77.4 66.2,77.443 66.15,77.493 66.15,78.65 66.6,79.1 C100.2@67.7,79.1 67.7,79.55 68.05,79.9 Y2.1@68.05,81.6
USBDN1_CON_N: D10.2 J22.2 L6.3 | length 10.7
  L6 w0.25: J22.2@57.5,97.33 57.45,97.33 56.675,98.105 56.675,100.325 55.775,101.225 55.775,102.475 55.95,102.65 56.1,102.65 56.375,102.925 56.375,103.275 56.1,103.55 55.95,103.55 55.775,103.725 55.775,104.175 55.975,104.375 57.325,104.375 57.5,104.2 L6.3@58.075,104.2
USBDN1_CON_P: D10.4 J22.3 L6.4 | length 10.7
  L6 w0.25: J22.3@55.5,97.33 56.225,98.055 56.225,100.139 55.325,101.039 55.325,104.361 55.789,104.825 57.325,104.825 57.5,105 L6.4@58.075,105
USBDN1_N: L6.2 U13.1 | length 43.6
  L1 w0.25: v1(61.8,89.1) 61.978,89.1 62.053,89.025 62.875,89.025 63.5,88.4 63.5,86.2 59,81.7 59,78.4 60.8,76.6 61.8,76.6 62.325,76.075 62.675,76.075 62.7,76.1 U13.1@63.4,76.1
  L6 w0.25: L6.2@59.925,104.2 60.5,104.2 60.7,104.4 61.2,104.4 61.45,104.15 61.45,104 61.725,103.725 62.075,103.725 62.35,104 62.35,104.15 62.6,104.4 63.2,104.4 65.65,101.95 65.65,90.282 64.393,89.025 63.9,89.025 63.65,89.275 63.65,89.425 63.375,89.7 63.025,89.7 62.75,89.425 62.75,89.275 62.5,89.025 62.053,89.025 61.978,89.1 v1(61.8,89.1)
USBDN1_OC: R70.1 U11.2 U13.13 | length 27.8
  L1 w0.25: U13.13@65.7,71.3 65.7,70.757 65.65,70.707 65.65,70.279 66.129,69.8 66.4,69.8 68.2,68 69.3,68 70.1,67.2 74.2,67.2 77.1,70.1 77.1,71.2 77.9,72 77.9,72.5 78.6,73.2 78.6,74.9 78.1,75.4 75.2,75.4 74.765,74.965 U11.2@74.765,73.5 74.765,72.5 74.9,72.365 R70.1@74.9,71.8
USBDN1_P: L6.1 U13.2 | length 43.6
  L1 w0.25: v1(61.8,88.5) 61.978,88.5 62.053,88.575 62.689,88.575 63.05,88.214 63.05,86.386 58.55,81.886 58.55,78.214 60.614,76.15 61.614,76.15 62.139,75.625 62.675,75.625 62.7,75.6 U13.2@63.4,75.6
  L6 w0.25: L6.1@59.925,105 60.5,105 60.65,104.85 63.386,104.85 65,103.236 66.1,102.136 66.1,90.096 65,88.996 64.579,88.575 62.053,88.575 61.978,88.5 v1(61.8,88.5)
USBDN1_PWR_EN: U11.1 U13.12 | length 31.1
  L1 w0.25: U13.12@65.2,71.3 65.2,70 65.9,69.3 66.207,69.3 68.1,67.407 68.1,67.4 69.3,66.2 74.2,66.2 77.6,69.6 77.6,70.9 78.5,71.8 78.5,72.3 79.3,73.1 79.3,75.3 78.5,76.1 74.7,76.1 73.495,74.895 U11.1@73.495,73.5
USBDN2_CON_N: D11.2 J22.6 L5.4 | length 7
  L6 w0.25: J22.6@57.5,94.71 56.775,93.985 56.775,91.825 57.675,90.925 57.675,89.324 57.9,89.099 L5.4@57.9,88.525
USBDN2_CON_P: D11.4 J22.7 L5.3 | length 7
  L6 w0.25: J22.7@55.5,94.71 56.325,93.885 56.325,91.639 57.225,90.739 57.225,89.224 57.1,89.099 L5.3@57.1,88.525
USBDN2_N: L5.1 U13.3 | length 18.9
  L1 w0.25: v1(57.8,85.8) 57.8,85.622 57.725,85.547 57.725,85.125 55.55,82.95 55.55,78.95 55.9,78.6 56.186,78.6 56.336,78.75 56.65,78.75 56.95,78.45 56.95,78.164 56.8,78.014 56.8,77.7 59.425,75.075 62.675,75.075 62.7,75.1 U13.3@63.4,75.1
  L6 w0.25: v1@57.825,85.8 57.825,86.024 57.9,86.099 L5.1@57.9,86.675
USBDN2_OC: R71.1 U11.3 U13.17 | length 13.1
  L1 w0.25: U13.17@67.7,71.3 67.7,70.2 68.7,69.2 74.2,69.2 74.9,69.9 R71.1@74.9,70.2 74.9,70.7 76.035,71.835 U11.3@76.035,73.5
USBDN2_P: L5.2 U13.4 | length 18.9
  L1 w0.25: v1(57.2,85.8) 57.2,85.622 57.275,85.547 57.275,85.311 55.1,83.136 55.1,78.764 59.239,74.625 62.675,74.625 62.7,74.6 U13.4@63.4,74.6
  L6 w0.25: L5.2@57.1,86.675 57.1,86.099 57.175,86.024 v1@57.175,85.8
USBDN2_PWR_EN: U11.4 U13.16 | length 15.7
  L1 w0.25: U13.16@67.2,71.3 67.2,70.757 67.25,70.707 67.25,69.85 68.5,68.6 71.207,68.6 71.607,68.2 74.3,68.2 76.4,70.3 76.4,71.293 77.305,72.198 U11.4@77.305,73.5
USBDN3_CON_N: D13.2 J23.2 L7.4 | length 9.9
  L1 w0.25: J23.2@15,79.04 16.045,80.085 16.4,80.085 16.86,79.625 19.075,79.625 19.975,78.725 21.225,78.725 21.7,79.2 21.7,79.5 21.975,79.775 22.525,79.775 22.7,79.6 L7.4@23.175,79.6
USBDN3_CON_P: D13.4 J23.3 L7.3 | length 9.9
  L1 w0.25: J23.3@15,81.58 16.045,80.535 16.586,80.535 17.046,80.075 19.261,80.075 20.161,79.175 21.039,79.175 21.25,79.386 21.25,79.686 21.789,80.225 22.425,80.225 22.6,80.4 L7.3@23.175,80.4
USBDN3_N: L7.1 U13.6 | length 46
  L1 w0.25: L7.1@25.025,79.6 25.6,79.6 25.775,79.775 25.975,79.775 v1(26.1,79.65) ; v1(28.925,81.5) 28.925,81.322 28.85,81.247 28.85,80.65 29.3,80.2 29.85,80.2 30.025,80.375 30.025,80.55 30.3,80.825 30.65,80.825 30.925,80.55 30.925,80.375 31.1,80.2 31.8,80.2 33.65,82.05 41.05,82.05 46.664,76.436 55.264,76.436 58.125,73.575 62.675,73.575 62.7,73.6 U13.6@63.4,73.6
  L3 w0.2: v1(26.1,79.65) 26.225,79.775 28.111,79.775 28.85,80.514 28.85,81.425 v1(28.925,81.5)
USBDN3_OC: R72.1 U12.2 U13.19 | length 62.5
  L1 w0.25: U12.2@26.8,66.665 27.665,66.665 28.1,67.1 28.1,72.8 34.3,79 38.6,79 41.6,76 43.5,76 45.4,74.1 53.2,74.1 53.9,74.8 v1(53.9,75.2) ; U13.19@69,72.1 v1(69.8,72.1) 70.031,71.869 70.031,70.969 R72.1@70.8,70.2
  L6 w0.25: v1(53.9,75.2) 54.6,74.5 59.8,74.5 62.2,72.1 62.2,70.4 63.4,69.2 67.8,69.2 69.8,71.2 v1(69.8,72.1)
USBDN3_P: L7.2 U13.7 | length 46
  L1 w0.25: L7.2@25.025,80.4 25.6,80.4 25.775,80.225 25.975,80.225 v1(26.1,80.35) ; v1(28.325,81.5) 28.325,81.322 28.4,81.247 28.4,80.464 29.114,79.75 31.986,79.75 33.836,81.6 40.864,81.6 46.477,75.986 55.077,75.986 57.939,73.125 62.675,73.125 62.7,73.1 U13.7@63.4,73.1
  L3 w0.2: v1(26.1,80.35) 26.1,80.675 26.275,80.85 26.725,80.85 26.9,80.675 26.9,80.45 27.125,80.225 27.925,80.225 28.4,80.7 28.4,81.425 v1(28.325,81.5)
USBDN3_PWR_EN: U12.1 U13.18 | length 57.5
  L1 w0.25: U12.1@26.8,65.395 27.795,65.395 28.9,66.5 28.9,72.4 34.7,78.2 38.2,78.2 41.3,75.1 43.2,75.1 45,73.3 53.5,73.3 54.9,74.7 v1(54.9,75.2) ; v1(68.2,70.5) U13.18@68.2,71.3
  L6 w0.25: v1(54.9,75.2) 60,75.2 62.9,72.3 62.9,70.6 63.6,69.9 67.6,69.9 v1(68.2,70.5)
USER_LED_HDR: J33.4 R148.1 | length 19.7
  L1 w0.25: J33.4@75.46,3.46 75.46,4.16 76.7,5.4 76.7,9.6 78.5,11.4 78.5,18 76.9,19.6 R148.1@76.9,21.2
USER_LED_RED: D18.1 R146.1 | length 87
  L1 w0.25: D18.1@13,5 13,5.3 11.75,6.55 11.75,8.45 13.3,10 41,10 42.2,11.2 44.9,11.2 45.8,12.1 45.8,14.4 48.1,16.7 54.9,16.7 59.3,12.3 61.6,12.3 62.8,11.1 76.4,11.1 77.3,12 77.3,17.5 75.3,19.5 R146.1@75.3,21.2
USR_BTNN: C200.1 R149.1 U19.17 | length 38.9
  L1 w0.24: 63.6,26.4 63.8,26.4 63.95,26.25 U19.17@63.95,25.65
  L1 w0.25: v1(42,19.6) 43,19.6 45.15,21.75 45.85,21.75 50.2,26.1 62.8,26.1 63.1,26.4 63.6,26.4
  L6 w0.25: R149.1@40,8.5 C200.1@41.5,8.5 42.8,9.8 42.8,16 42,16.8 v1(42,19.6)
USR_BTNN_R: R147.1 R149.2 SW3.2 | length 8.7
  L6 w0.25: R149.2@40,7.5 R147.1@38.4,7.5 38.4,5.3 39.5,4.2 40.805,4.2 SW3.2@42.25,2.755
USR_LEDN: Q5.1 R183.1 U19.16 | length 11.5
  L1 w0.24: U19.16@64.45,25.65 64.45,26.2
  L1 w0.25: 64.45,26.2 64.45,26.55 65.7,27.8 68.7,27.8 71.1,25.4 R183.1@71.1,24.7 71.7,24.7 72.05,25.05 Q5.1@72.65,25.05
VBUS_DET: R75.2 R76.1 R169.1 U13.27 | length 4.6
  L1 w0.28: U13.27@69,76.1 69.6,76.1 69.8,76.3 v1(69.8,76.5)
  L6 w0.4: R76.1@69,76.4 69.1,76.5 v1(69.8,76.5) 70,76.3 R169.1@70.5,76.3 71,76.3 R75.2@72,77.3
pads on no net: FID1.1 FID2.1 FID3.1 FID4.1 FID5.1 FID6.1 FID7.1 FID8.1 J1.26 J1.49 J1.65 J1.66 J2.65 J2.66 J3.1 J3.2 J3.A5 J3.A6 J3.A7 J3.A8 J3.B9 J3.B12 J4.3 J4.5 J4.7 J4.17 J4.19 J4.45 J4.47 J4.49 J4.51 J4.55 J4.56 J5.3 J5.4 J5.S1 J5.S2 J6.7 J6.8 J7.3 J7.4 J7.S1 J7.S2 J8.7 J8.8 J9.3 J9.5 J9.7 J9.11 J9.13 J9.17 J9.19 J9.23 J9.25 J9.31 J9.33 J9.44 J9.46 J9.55 J9.56 J15.H2 J15.H4 J15.H5 J15.H6 J15.PC3 J15.PC4 J15.PC5 J15.PC6 J15.PC8 J15.PC9 J15.PC10 J15.PC11 J15.PC12 J19.6 J24.15 J24.16 J25.4 J25.5 J26.4 J26.5 J27.4 J27.5 J28.4 J28.5 J31.1 J31.2 J31.7 J31.8 U2.7 U2.8 U2.9 U2.15 U5.24 U5.25 U9.5 U10.7 U13.20 U13.21 U14.8 U14.9 U14.17 U14.18 U14.19 U14.22 U14.28 U16.9 U16.16 U16.20 U16.25 U16.32 U22.9

## Polygon pours and split planes (outlines as drawn)
GND on L6 "L6-No Net" (solid, pour order 277): 81.7,79.5 82.2,79.5 83.1,80.4 83.6,80.4 83.7,80.3 83.7,79.1 83,78.4 83,76.8 81.7,76.8
GND on L6 "L6-No Net" (solid, pour order 276): 80.5,76.8 79.2,76.8 79.2,77.4 78.5,78.1 78.5,79.3 78.7,79.5 78.8,79.5 80.5,79.5
GND on L6 "L6-No Net" (solid, pour order 178): 91.5,94.8 90.5,94.8 90.2,95.1 90.2,97.1 90.4,97.3 91.4,97.3 91.6,97.1 91.6,94.9
GND on L6 "L6-No Net" (solid, pour order 221): 110.3,82.6 111.9,82.6 112.4,82.1 113,82.1 113,82.6 112.2,83.4 112.2,83.9 112.1,84 111.6,84 111.4,83.8 111.1,83.5 110.3,83.5
GND on L6 "L6-No Net" (solid, pour order 222): 113.8,84.5 114.7,84.5 114.7,85.5 114.1,86.1 113.4,86.1 113.2,85.9 112.9,85.6 112.9,85.3 113,85.2 113.1,85.2
GND on L6 "L6-No Net" (solid, pour order 304): 9.1,44.6 9.3,44.4 9.3,43.2 9.1,43 5.8,43.01 5.8,44.61
GND on L6 "L6-No Net" (solid, pour order 233): 117.5,16 117.4,16.1 117.4,18.9 118.5,20 122.2,20 122.2,17 121.6,16.4 121.2,16
+VDDA on L6 "L6-No Net" (solid, pour order 177): 99.3,33 98.5,33 98.5,32.4 98,31.9 97.2,31.9 97,31.7 97,31.5 97.2,31.3 98,31.3 98.5,30.8 98.5,30.3 99.3,30.3
+MPCIE1_SIM_PWR on L6 "L6-No Net" (solid, pour order 204): 33.5,52.7 33.9,52.7 34.2,52.4 34.7,52.4 35,52.7 35,53.2 34.5,53.7 33.5,53.7
+BKLT_VCC on L6 "L6-No Net" (solid, pour order 238): 17 vertices, not listed, extent 116.4,69.6 130.4,75.1
+3V3_TS on L6 "L6-No Net" (solid, pour order 174): 19 vertices, not listed, extent 12.2,17.2 18.7,20.2
+3V3 on L6 "L6-No Net" (solid, pour order 171): 43.7,8.2 44.3,8.2 45.2,9.1 45.2,12.3 44.3,13.2 43.7,13.2 43.3,12.8 43.3,12 43.7,11.6
+3V3 on L6 "L6-No Net" (solid, pour order 169): 93,52.1 93,54.1 91,54.1 90.7,53.8 89.7,53.8 89.7,53.4 91,52.1 93,52.1
+3V3 on L6 "L6-No Net" (solid, pour order 244): 112.2,96.6 112.7,97.1 112.7,97.7 111.9,97.7 111.4,98.2 109.5,98.2 109.1,97.8 109.1,97.1 109.6,96.6
GND on L6 "L6-No Net" (solid, pour order 289): 56.1,83.1 57.7,83.1 57.7,85 57.3,85 56.4,85.9 56,85.9 55.5,85.4 55.5,85 56.1,84.4
GND on L6 "L6-No Net" (solid, pour order 324): 84.8,25.9 84.8,29.2 81.9,29.2 81.8,29.1 81.8,26.5 82.4,25.9
+3V3 on L6 "L6-No Net" (solid, pour order 192): 57.4,72.8 57.5,72.9 57.9,72.9 58.9,71.9 58.9,71.1 58.3,71.1 58,70.8 57.5,70.8 57.4,70.9
+3V3_USB_HUB on L6 "L6-No Net" (solid, pour order 191): 60.4,71.1 59.5,71.1 59.5,71.9 59.4,72 59.4,72.5 59.5,72.6 60.5,72.6 60.6,72.5 60.6,72.1 60.4,71.9
+BAT on L6 "L6-No Net" (solid, pour order 187): 35.2,96.4 35.4,96.4 35.7,96.7 40.5,96.7 42.8,94.4 42.8,91.8 42.5,91.5 41.5,91.5 41.2,91.8 41.2,93.7 39.8,95.1 35.5,95.1 35.2,95.4
GND on L6 "L6-No Net" (solid, pour order 184): 33.5,97.9 35.3,97.9 35.3,96.9 35,96.6 33.8,96.6 33.5,96.9
GND on L6 "L6-No Net" (solid, pour order 185): 23.2,94.4 25,94.4 25,93.4 24.7,93.1 23.5,93.1 23.2,93.4
GND on L6 "L6-No Net" (solid, pour order 172): 11,93.9 12.8,93.9 12.8,95.4 12.7,95.5 11.1,95.5 11,95.4
GND on L6 "L6-No Net" (solid, pour order 173): 11,91.7 12.8,91.7 12.8,93.2 12.7,93.3 11.1,93.3 11,93.2
GND on L6 "L6-No Net" (solid, pour order 175): 11,85.3 12.8,85.3 12.8,83.8 12.7,83.7 11.1,83.7 11,83.8
+3V3 on L6 "L6-No Net" (solid, pour order 170): 18 vertices, not listed, extent 0.7,86.2 12.7,92.8
+12V_ATX on L6 "L6-No Net" (solid, pour order 167): 24 vertices, not listed, extent 1.7,93.5 12.8,100.3
+5V_USB_OTG on L6 "L6-No Net" (solid, pour order 188): 10.4,76.6 10.4,75.5 10.7,75.2 10.7,72.1 6.4,72.1 5.8,72.7 5.8,74.8 6.2,75.2 9.2,75.2 9.5,75.5 9.5,76.6
+VBAT on L6 "L6-No Net" (solid, pour order 190): 42.5,90.9 42.8,90.6 42.8,87.7 41.7,87.7 41.2,88.2 41.2,90.6 41.5,90.9
+5V_LDO1 on L6 "L6-No Net" (solid, pour order 218): 112.4,81.6 113.1,81.6 113.2,81.7 113.2,82.7 112.6,83.3 112.4,83.5 112.4,83.9 114.7,83.9 114.7,82.6 113.7,81.6 113.7,80.5 112.9,80.5 112.4,81
+VIN on L6 "L6-No Net" (solid, pour order 219): 108.7,81.6 112.2,81.6 112.2,80.9 112.8,80.3 113.3,80.3 113.3,79.9 110.6,79.9 109.9,80.6 108.9,80.6 108.7,80.8
+5V_PVCC1 on L6 "L6-No Net" (solid, pour order 225): 109.3,82 109.3,83.8 109.7,84.2 111.9,84.2 112.1,84.4 113,84.4 113,85 108.7,85 107.8,84.1 107.8,82
+VDD_LVDS on L6 "L6-No Net" (solid, pour order 245): 21 vertices, not listed, extent 1.3,12 12.6,15.7
GND on L6 "L6-No Net" (solid, pour order 250): 3,14.4 4.1,14.4 4.6,14.9 4.6,15.8 3.6,16.8 3.6,18.2 3,18.2 3,16.7 2.8,16.5 2.8,14.6
+VDD_LVDS_SW on L6 "L6-No Net" (solid, pour order 251): 4.3,17.6 6.1,17.6 6.1,18.3 5,19.4 5,19.7 4.6,20.1 4.6,22.3 4.3,22.6 3.7,22.6 3.4,22.3 3.4,20.2 4.1,19.5 4.1,18.4 4.3,18.2
GND on L6 "L6-No Net" (solid, pour order 252): 8.3,19.5 5.4,19.5 5.4,22.4 4.6,23.2 3.9,23.2 3.6,23.5 3.6,24.7 3.9,25 5.6,25 8.3,22.3
+VDD_LVDS on L6 "L6-No Net" (solid, pour order 255): 7.3,33.3 8.3,33.3 8.5,33.5 8.5,35.7 7.9,35.7 7.6,35.4 7.6,34.6 7.3,34.3 7.3,33.3
GND on L6 "L6-No Net" (solid, pour order 194): 63.8,72.1 68.1,72.1 68.1,76.7 67.7,76.7 67.1,76.1 63.8,76.1
+1V5 on L6 "L6-No Net" (solid, pour order 268): 49.1,36.5 52,36.5 52,37.8 52,38.2 51.7,38.5 51.6,38.6 50.5,38.6 50.2,38.6 49.1,37.5 49.1,36.5
GND on L6 "L6-No Net" (solid, pour order 273): 50.2,33.1 52.2,33.1 52.2,34 52.3,34.1 52.3,34.4 52.2,34.5 51,34.5 50.9,34.5 50.2,33.8 50.2,33.1
GND on L6 "L6-No Net" (solid, pour order 267): 113,94.7 115.3,94.7 115.8,95.2 115.8,97.2 115.5,97.5 113.3,97.5 113,97.2
GND on L6 "L6-No Net" (solid, pour order 279): 80.3,85 81.9,85 81.9,82.7 81.7,82.5 80.5,82.5 80.3,82.7
GND on L6 "L6-No Net" (solid, pour order 274): 56.3,76.8 55,76.8 54.3,77.5 54.3,78.8 55,79.5 56.3,79.5
GND on L6 "L6-No Net" (solid, pour order 288): 57.5,76.8 58.8,76.8 58.8,77.7 59.7,78.6 59.7,79.6 59.6,79.7 57.7,79.7 57.5,79.5
GND on L6 "L6-No Net" (solid, pour order 291): 46.9,83.2 46.9,85 45.1,85 45,85 44.7,84.7 44.7,83.4 45,83.1 46.9,83.1 46.9,83.3
GND on L6 "L6-No Net" (solid, pour order 295): 22.5,76.8 23.8,76.8 24.4,77.4 24.4,77.8 24.4,78.9 24.4,79 23.9,79.5 23.7,79.5 22.5,79.5 22.5,76.8
GND on L6 "L6-No Net" (solid, pour order 298): 21.1,85 22.7,85 22.7,82.8 22.4,82.5 21.4,82.5 21.1,82.8 21.1,85